# Altium PCB HouseLIght_v0.PcbDoc
Units mm, origin at the board's own origin, x right, y up, seen from the top; angles counter-clockwise.
Board outline 150.23 x 33.22 mm, 2 copper layers (Top Layer, Bottom Layer); 56 components, 50 nets, 133 pads, 101 vias.
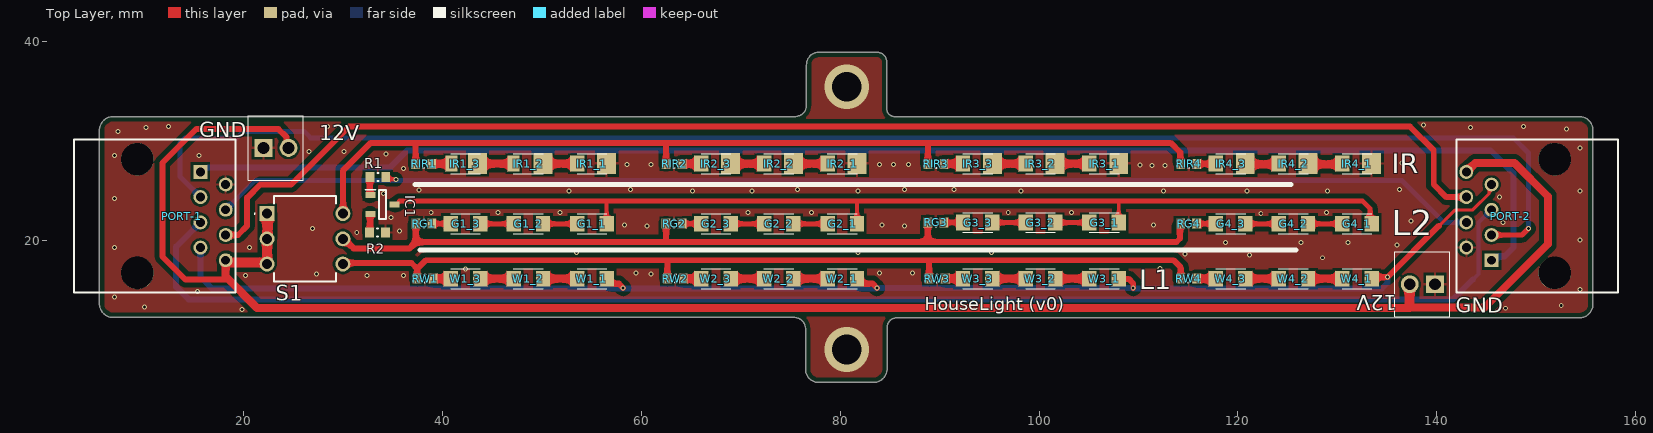
[diagram p0: Top Layer view]
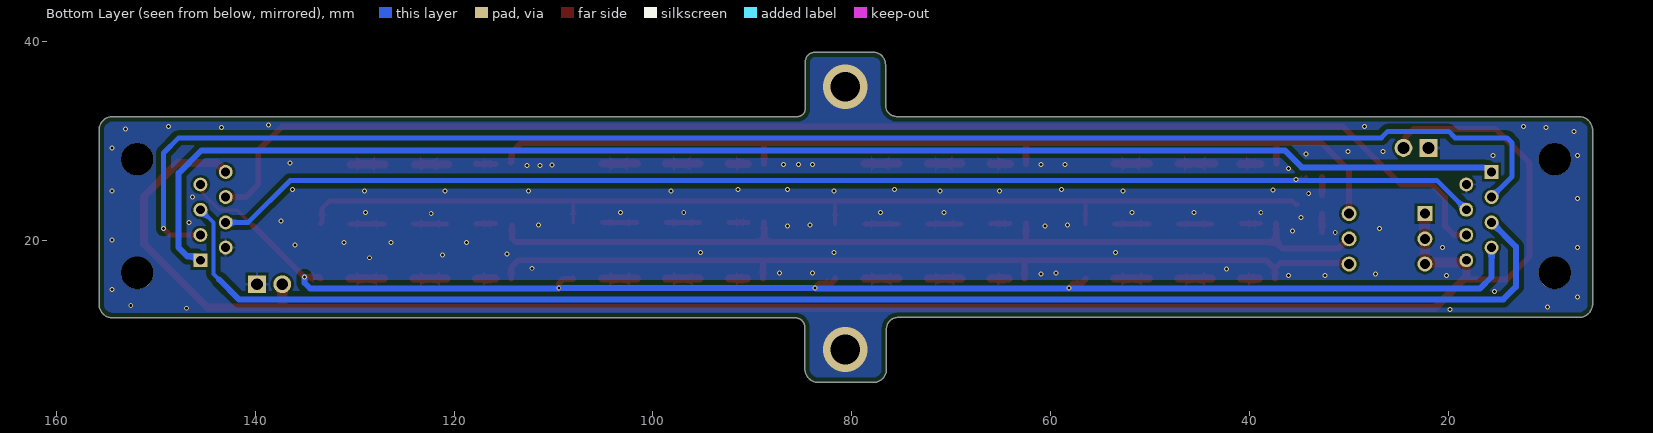
[diagram p1: Bottom Layer view, seen from below]
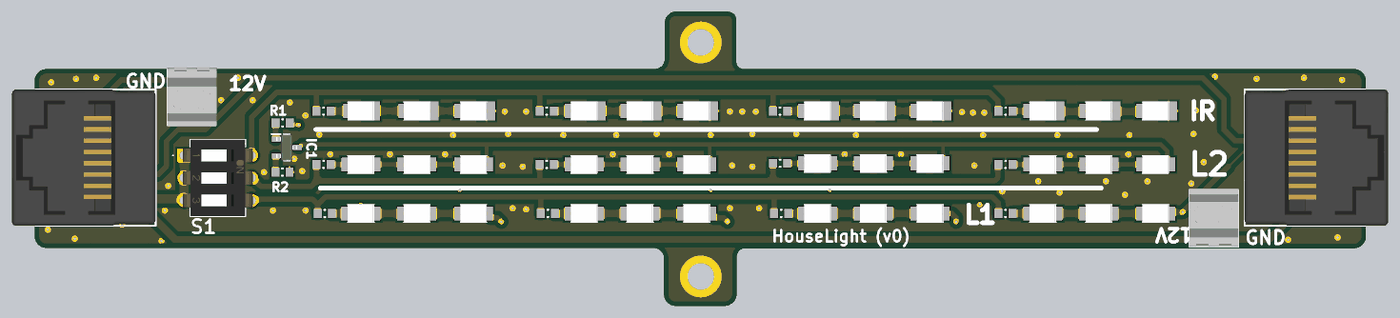
[diagram p2: 3D render of the assembled board from above, using the file's embedded part models]

## Layer stack, top to bottom
Top Solder: solder mask 0.0102, Solder Resist, Dk 3.5
Top Layer: signal copper 0.0356
Dielectric 1: dielectric 0.32, FR-4, Dk 4.8
Bottom Layer: signal copper 0.0356
Bottom Solder: solder mask 0.0102, Solder Resist, Dk 3.5

## Board outline
76.512,7.075 76.512,11.112 ccw(c75.343,11.112) 75.343,12.282 6.858,12.282 cw(c6.858,13.652) 5.488,13.652 5.488,31.115 cw(c6.858,31.115) 6.858,32.485 75.438,32.485 ccw(c75.438,33.655) 76.608,33.655 76.608,37.719 cw(c77.851,37.719) 77.851,38.962 83.693,38.962 cw(c83.693,37.973) 84.682,37.973 84.682,33.274 ccw(c85.471,33.274) 85.471,32.485 154.348,32.485 cw(c154.348,31.115) 155.718,31.115 155.718,13.619 cw(c154.348,13.619) 154.348,12.248 85.7,12.248 ccw(c85.7,11.262) 84.713,11.262 84.713,7.112 cw(c83.343,7.112) 83.343,5.742 77.846,5.742 cw(c77.846,7.075)

## Design rules (kind name [scope] priority, off if disabled: settings)
BoardOutlineClearance [All] p1: gap=0.254 ignorepadtopadclearanceinfootprint=FALSE except(0: Arc-SplitContinuation Track-SplitContinuation SMDPad-SplitContinuation THPad-SplitContinuation Via-SplitContinuation Fill-SplitContinuation Poly-SplitContinuation Region-SplitContinuation Text-SplitContinuation; 0.3: Poly-CavityEdge Poly-CutoutEdge Poly-SplitBarrior; 0.5: Poly-OutlineEdge)
Clearance [All] p1: gap=0.254 ignorepadtopadclearanceinfootprint=FALSE except(0: Arc-Hole Track-Hole SMDPad-Hole THPad-Hole Via-Hole Fill-Hole Poly-Hole Region-Hole; 0.15: SMDPad-SMDPad; 0.203: Arc-Arc Arc-Track Track-Track; 0.25: Arc-SMDPad Track-SMDPad; 0.33: Arc-THPad Track-THPad; 0.5: Arc-Fill Arc-Poly Arc-Region Track-Fill Track-Poly Track-Region THPad-THPad Text-Hole)
DiffPairsRouting [InDifferentialPairClass('All Differential Pairs')] p1: maxlimit=0.203 minlimit=0.203 mostfreqgap=0.203 toplayer_minwidth=0.303 toplayer_maxwidth=0.303 toplayer_prefwidth=0.303 bottomlayer_minwidth=0.303 bottomlayer_maxwidth=0.303 bottomlayer_prefwidth=0.303 impedanceprofiledriven=TRUE maxuncoupledlength=12.7
PolygonConnect [All] p1: thpad.connectstyle=Relief thpad.reliefconductorwidth=0.254 thpad.reliefentries=4 thpad.polygonreliefangle="90 Angle" thpad.airgapwidth=0.254 smdpad.connectstyle=Relief smdpad.reliefconductorwidth=0.254 smdpad.reliefentries=4 smdpad.polygonreliefangle="90 Angle" smdpad.airgapwidth=0.254 via.connectstyle=Direct via.reliefconductorwidth=0.254 via.reliefentries=4 via.polygonreliefangle="90 Angle" via.airgapwidth=0.254
RoutingVias [All] p1: holewidth=0.711 width=1.27 viastyle="Through Hole" minholewidth=0.711 minwidth=1.27 maxholewidth=0.711 maxwidth=1.27
SolderMaskExpansion [All] p1: expansion=0.102 istentingtop=FALSE
SupplyNets "Schematic Supply Nets_2" [InNet('GND')] p1: voltage=0.000
SupplyNets "Schematic Supply Nets_1" [InNet('+5V')] p2: voltage=0.000
SupplyNets "Schematic Supply Nets" [InNet('+12V')] p3: voltage=0.000
UnRoutedNet [All] p1: checkbadconnections=TRUE
Width [All] p1: maxlimit=3 minlimit=0.15 preferedwidth=0.254 minimp=50.000000 maximp=50.000000 favimp=50.000000
28 further rules are at their usual default settings.

## Components (designator, comment, footprint, x,y, rotation, side; value= is the part's Value field where it differs from the comment)
12V "282834-2" 282834-2_1 21.971,29.337 r0 top (schematic designator IO3)
12V "282834-2" 282834-2_1 139.827,15.621 r180 top (schematic designator IO3)
G1_1 "SML-010PTT86" SML010PTT86#1 55.029,21.702 r270 top
G1_2 "SML-010PTT86" SML010PTT86#1 48.629,21.702 r270 top
G1_3 "SML-010PTT86" SML010PTT86#1 42.315,21.702 r270 top
G2_1 "SML-010PTT86" SML010PTT86#1 80.214,21.702 r270 top
G2_2 "SML-010PTT86" SML010PTT86#1 73.814,21.702 r270 top
G2_3 "SML-010PTT86" SML010PTT86#1 67.5,21.702 r270 top
G3_1 "SML-010PTT86" SML010PTT86#1 106.542,21.829 r270 top
G3_2 "SML-010PTT86" SML010PTT86#1 100.142,21.829 r270 top
G3_3 "SML-010PTT86" SML010PTT86#1 93.828,21.829 r270 top
G4_1 "SML-010PTT86" SML010PTT86#1 131.981,21.702 r270 top
G4_2 "SML-010PTT86" SML010PTT86#1 125.581,21.702 r270 top
G4_3 "SML-010PTT86" SML010PTT86#1 119.267,21.702 r270 top
IC1 "SI2302CDS-T1-GE3" SOT96P237X111-3N 33.949,23.622 r0 top
IR1_1 "IN-S126ETHIR" SML010PTT86#2 55.029,27.751 r270 top
IR1_2 "IN-S126ETHIR" SML010PTT86#3 48.629,27.751 r270 top
IR1_3 "IN-S126ETHIR" SML010PTT86#4 42.315,27.751 r270 top
IR2_1 "IN-S126ETHIR" SML010PTT86#2 80.214,27.751 r270 top
IR2_2 "IN-S126ETHIR" SML010PTT86#2 73.814,27.751 r270 top
IR2_3 "IN-S126ETHIR" SML010PTT86#2 67.5,27.751 r270 top
IR3_1 "IN-S126ETHIR" SML010PTT86#2 106.542,27.751 r270 top
IR3_2 "IN-S126ETHIR" SML010PTT86#2 100.142,27.751 r270 top
IR3_3 "IN-S126ETHIR" SML010PTT86#2 93.828,27.751 r270 top
IR4_1 "IN-S126ETHIR" SML010PTT86#2 131.981,27.751 r270 top
IR4_2 "IN-S126ETHIR" SML010PTT86#2 125.581,27.751 r270 top
IR4_3 "IN-S126ETHIR" SML010PTT86#2 119.267,27.751 r270 top
PORT-1 "215877-1" 615008138021 11.049,22.479 r270 top
PORT-2 "215877-1" 615008138021 150.114,22.479 r90 top
R1 "10" 0603R 33.487,26.396 r0 top value=12K1
R2 "100K" 0603R 33.46,20.848 r0 top value=12K1
RG1 "2K2" 0603R 38.111,21.713 r180 top value=12K1
RG2 "2K2" 0603R 63.285,21.713 r180 top value=12K1
RG3 "2K2" 0603R 89.613,21.84 r180 top value=12K1
RG4 "2K2" 0603R 115.052,21.713 r180 top value=12K1
RIR1 "1K3" 0603R 38.1,27.725 r180 top value=12K1
RIR2 "1K3" 0603R 63.285,27.725 r180 top value=12K1
RIR3 "1K3" 0603R 89.613,27.725 r180 top value=12K1
RIR4 "1K3" 0603R 115.052,27.725 r180 top value=12K1
RW1 "2K2" 0603R 38.238,16.183 r180 top value=12K1
RW2 "2K2" 0603R 63.412,16.183 r180 top value=12K1
RW3 "2K2" 0603R 89.74,16.183 r180 top value=12K1
RW4 "2K2" 0603R 115.052,16.183 r180 top value=12K1
S1 "2454982-2" 24549822 22.352,22.733 r270 top
W1_1 "LTW-150TK" SML010PTT86#1 55.029,16.178 r270 top
W1_2 "LTW-150TK" SML010PTT86#1 48.629,16.178 r270 top
W1_3 "LTW-150TK" SML010PTT86#1 42.315,16.178 r270 top
W2_1 "LTW-150TK" SML010PTT86#1 80.214,16.178 r270 top
W2_2 "LTW-150TK" SML010PTT86#1 73.814,16.178 r270 top
W2_3 "LTW-150TK" SML010PTT86#1 67.5,16.178 r270 top
W3_1 "LTW-150TK" SML010PTT86#1 106.542,16.178 r270 top
W3_2 "LTW-150TK" SML010PTT86#1 100.142,16.178 r270 top
W3_3 "LTW-150TK" SML010PTT86#1 93.828,16.178 r270 top
W4_1 "LTW-150TK" SML010PTT86#1 131.981,16.178 r270 top
W4_2 "LTW-150TK" SML010PTT86#1 125.581,16.178 r270 top
W4_3 "LTW-150TK" SML010PTT86#1 119.267,16.178 r270 top

## Footprints (in the part's own frame and the unit in brackets; to place one, negate y for a bottom-side part, rotate by r counter-clockwise, add the part's x,y. Pads: shape width x height; smd on the part's side, far side on the other; paste and mask are expansions set on the pad)
0603R [mm] "Chip Resistor, Body 1.6x0.8mm, IPC Medium Density"
  rect 0.9x1 smd: 1(-0.8,0) 2(0.8,0)
  silkscreen extent -0.05,-0.4 0.05,0.4, body extent -0.85,-0.47 0.85,0.47, height 0.6
282834-2_1 [mm]
  rect 1.8x1.8 hole 1.2: 1(0,0)
  round 1.8 hole 1.2: 2(2.54,0)
  silkscreen extent -1.5,-3.25 4.04,3.25, body extent -1.5,-3.25 4.04,3.25, height 9.87
24549822 [mm]
  rect 1.5x1.5 hole 1: 1(0,0)
  round 1.5 hole 1: 2(2.54,0) 3(5.08,0) 4(5.08,7.62) 5(2.54,7.62) 6(0,7.62)
  silkscreen extent -1.77,-1.3 6.85,6.91, body extent -1.77,-0.13 6.85,7.75, height 7.25
615008138021 [mm] "Modular Jack Vertical Plastic 8P8C"
  rect 1.4x1.4 hole 0.9: 1(-4.445,4.6)
  round 1.4 hole 0.9: 2(-3.175,7.14) 3(-1.905,4.6) 4(-0.635,7.14) 5(0.635,4.6) 6(1.905,7.14) 7(3.175,4.6) 8(4.445,7.14)
  round 3.25 hole 3.25 unplated: MH1(-5.715,-1.75) MH2(5.715,-1.75)
  silkscreen extent -7.7,-8.1 7.7,8.1, body extent -7.7,-8.1 7.7,8.1, height 16.5
SML010PTT86#1 [mm]
  rect 1.6x1.45 smd: 1(0,1.475) 2(0,-1.475)
  silkscreen extent -1,-1.5 1,1.5, body extent -1,-1.52 1,1.52, height 1.5
SML010PTT86#2 [mm]
  rect 2.1x1.9 smd: 1(0,1.475)
  rect 1.6x1.45 smd: 2(0,-1.475)
  silkscreen extent -1,-1.5 1,1.5, body extent -1,-1.52 1,1.52, height 1.5
SML010PTT86#3 [mm]
  rect 2.1x1.9 smd: 1(0,1.475)
  rect 1.6x1.2 smd: 2(0,-1.475)
  silkscreen extent -1,-1.5 1,1.5, body extent -1,-1.52 1,1.52, height 1.5
SML010PTT86#4 [mm]
  rect 2.1x1.9 smd: 1(0,1.203)
  rect 1.6x1.2 smd: 2(0,-1.397)
  silkscreen extent -1,-1.5 1,1.5, body extent -1,-1.52 1,1.52, height 1.5
SOT96P237X111-3N [mm]
  rect 1x0.6 smd: 1(-1.2,0.955) 2(-1.2,-0.955) 3(1.2,0)
  silkscreen extent -1.7,-1.46 0.35,1.5, body extent -1.19,-1.46 1.19,1.46, height 1.11

## Part data
12V 12V: "Connector", Manufacturer_Name="TE Connectivity", Mouser2 Part Number=571-282834-2, Datasheet Link=https://componentsearchengine.com//282834-2.pdf, Manufacturer_Part_Number=282834-2, Mouser2 Price/Stock=https://www.mouser.com/Search/Refine.aspx?Keyword=571-282834-2
G1_1 G1_2 G1_3 G2_1 G2_2 G2_3 G3_1 G3_2 G3_3 G4_1 G4_2 G4_3: "2.2V 20mA 555nm 6.3mcd Emerald Green Water Clear SMD,3x2mm LED Indication - Discrete ROHS", Manufacturer_Name="ROHM Semiconductor", Mouser Part Number=755-SML-010PTT86, Datasheet Link=https://componentsearchengine.com/Datasheets/1/SML-010PTT86.pdf, Manufacturer_Part_Number=SML-010PTT86, Mouser Price/Stock=https://www.mouser.co.uk/ProductDetail/ROHM-Semiconductor/SML-010PTT86?qs=4kLU8WoGk0sTbaHXE%252BLu9Q%3D%3D
IC1: "1 N-Channel 2.9A 20V 3.5nC@10V,4.5V 550mW 75mΩ@2.5V,3.1A 850mV@250uA N-Channel SOT-23 MOSFETs ROHS (C10488)", Manufacturer_Name=Vishay, Mouser Part Number=781-SI2302CDS-T1-GE3, Arrow Part Number=SI2302CDS-T1-GE3, Arrow Price/Stock=https://www.arrow.com/en/products/si2302cds-t1-ge3/vishay?utm_currency=USD&region=europe, Datasheet Link=https://datasheet.datasheetarchive.com/originals/distributors/Datasheets-DGA23/1579559.pdf, Height=1.12mm, Manufacturer_Part_Number=SI2302CDS-T1-GE3, Mouser Price/Stock=https://www.mouser.co.uk/ProductDetail/Vishay-Semiconductors/SI2302CDS-T1-GE3?qs=IRuQNBqMOcmu69KRt6rZUQ%3D%3D
IR1_1 IR1_2 IR1_3 IR2_1 IR2_2 IR2_3 IR3_1 IR3_2 IR3_3 IR4_1 IR4_2 IR4_3: library part SML-010PTT86, "-40℃~+85℃ 1.2V 30° 5mW/sr@20mA 940nm 1206 Infrared LED Emitters ROHS (C22466173)", Manufacturer_Name="ROHM Semiconductor", Mouser Part Number=755-SML-010PTT86, Datasheet Link=https://componentsearchengine.com/Datasheets/1/SML-010PTT86.pdf, Manufacturer_Part_Number=SML-010PTT86, Mouser Price/Stock=https://www.mouser.co.uk/ProductDetail/ROHM-Semiconductor/SML-010PTT86?qs=4kLU8WoGk0sTbaHXE%252BLu9Q%3D%3D
PORT-1 PORT-2: library part CMP-1502-01725-1, "-40℃~+70℃ 1 Gold Non-LED Phosphor Bronze RJ45 Jack Unshielded cat3 Plugin Ethernet Connectors / Modular Connectors (RJ45 RJ11) ROHS (C305919)", Contact Resistance=20mOhm, Manufacturer="Wurth Elektronik", Operating Temperature=-40to85degC, Package Reference=615008138021, Rated Current=1.5A, Withstanding Voltage=1000VAC, Working Voltage=120VAC, Compliance=Leadfree/RoHS, Datasheet URL=https://katalog.we-online.de/em/datasheet/615008138021.pdf, Entrance=Vertical, Manufacturer URL=http://www.we-online.de, Mounting Technology=THT, Packaging=Tray, Part Number=615008138021, Pin Number=8P8C, Port=1x1, Publisher=WurthElektronik
R1: library part Res_12K1_1%_0603, "-55℃~+155℃ 100kΩ 100mW 75V Thick Film Resistor ±1% ±100ppm/℃ 0603 Chip Resistor - Surface Mount ROHS (C14675)", Manuf_1=VISHAY, Manuf_Part_1="MCT 0603-50 1% P5 12K1", Distrib=FARNELL, ECCN_US/EU=n/a, Order=2325243
R2: library part Res_12K1_1%_0603, "-55℃~+155℃ 100mW 100kΩ 75V Thick Film Resistor ±1% ±100ppm/℃ 0603 Chip Resistor - Surface Mount ROHS", Manuf_1=VISHAY, Manuf_Part_1="MCT 0603-50 1% P5 12K1", Distrib=FARNELL, ECCN_US/EU=n/a, Order=2325243
RG1 RG2 RG3 RG4 RIR1 RIR2 RIR3 RIR4 RW1 RW2 RW3 RW4: library part Res_12K1_1%_0603, "-55℃~+155℃ 100mW 2.2kΩ 75V Thick Film Resistor ±1% ±100ppm/℃ 0603 Chip Resistor - Surface Mount ROHS (C309562)", Manuf_1=VISHAY, Manuf_Part_1="MCT 0603-50 1% P5 12K1", Distrib=FARNELL, ECCN_US/EU=n/a, Order=2325243
S1: "Switch", Manufacturer_Name="TE Connectivity", Mouser Part Number=655-2454982-2, Arrow Part Number=2454982-2, Arrow Price/Stock=https://www.arrow.com/en/products/2454982-2/te-connectivity?region=nac, Datasheet Link=https://www.mouser.com/datasheet/2/418/3/NG_CS_1308111-1_SWITCHES_CORE_PROGRAM_CATALOG_0308-1234892.pdf, Height=4.51mm, Manufacturer_Part_Number=2454982-2, Mouser Price/Stock=https://www.mouser.co.uk/ProductDetail/TE-Connectivity-Alcoswitch/2454982-2?qs=1Kr7Jg1SGW%2FyvNyTL9wDrw%3D%3D
W1_1 W1_2 W1_3 W2_1 W2_2 W2_3 W3_1 W3_2 W3_3 W4_1 W4_2 W4_3: library part SML-010PTT86, "-20℃~+80℃ 130° 20mA 260mcd 3.2V 70mW Discrete Diode White Yellow Lens 1206 LED Indication - Discrete ROHS (C133134)", Manufacturer_Name="ROHM Semiconductor", Mouser Part Number=755-SML-010PTT86, Datasheet Link=https://componentsearchengine.com/Datasheets/1/SML-010PTT86.pdf, Manufacturer_Part_Number=SML-010PTT86, Mouser Price/Stock=https://www.mouser.co.uk/ProductDetail/ROHM-Semiconductor/SML-010PTT86?qs=4kLU8WoGk0sTbaHXE%252BLu9Q%3D%3D

## Via types
v1: diameter 0.5, hole 0.3, Top Layer to Bottom Layer, 99 vias
v2: diameter 4.5, hole 3, Top Layer to Bottom Layer, 2 vias

## Nets (pads, with @x,y where several pads share a name; then routed paths per layer and width w, separated by ;. In a path a pad name is that pad's centre, name@x,y a point inside that pad or via, vN(x,y) a via of type N, cw(c..) or ccw(c..) an arc to the next point about the centre after c; other vN are vias at no path point)
+5V: PORT-1.6 PORT-2.6 | length 135.9
  Top Layer w0.6: PORT-1.6 19.421,20.574 20.35,21.502 20.35,24.324 21.679,25.654 24.765,25.654 30.586,31.475 137.308,31.475 139.7,29.083 139.7,25.654 140.97,24.384 PORT-2.6
+12V: 12V.2 PORT-1.8 PORT-2.8 S1.1 S1.2 S1.3 | length 197.2
  Top Layer w0.6: 18.288,16.101 14.125,16.101 11.811,18.415 11.811,27.813 15.24,31.242 23.487,31.242 24.281,30.447 24.281,29.567 12V.2@24.511,29.337
  Top Layer w0.8: PORT-1.8 18.189,16.402 21.348,13.243 137.173,13.243 ; 137.197,13.263 144.787,13.263 151.172,19.648 151.172,24.469 147.813,27.828 143.878,27.828 PORT-2.8
  Top Layer w1: PORT-1.8 18.297,18.034 18.506,17.825 S1.3@22.352,17.825 ; S1.3 S1.3@22.352,17.825 ; S1.1 22.393,22.692 22.393,20.234 S1.2 S1.3@22.352,17.825 ; 137.265,13.322 12V.2@137.265,15.599
DIO_A: PORT-1.1 PORT-2.1 | length 144.1
  Bottom Layer w0.6: PORT-1.1 16.049,27.324 16.338,27.324 16.4,27.387 34.753,27.387 36.449,29.083 145.415,29.083 147.701,26.797 147.701,19.304 146.831,18.434 145.914,18.434 PORT-2.1
GND: 12V.1 IR1_1.1 IR2_1.1 IR3_1.1 IR4_1.1 PORT-1.2 PORT-2.2 R2.2
  other v1: 19.812,13.081 146.939,13.208 10.033,13.335 152.527,13.462 6.985,14.351 15.367,14.915 154.432,15.113 20.193,16.51 32.385,16.51 36.068,16.51 27.305,16.637 60.96,16.637 59.436,16.764 83.947,16.764 87.249,16.764 42.291,17.145 112.145,17.23 128.524,18.288 121.158,18.542 114.681,18.669 53.467,18.838 81.788,18.838 95.221,18.838 6.985,19.304 20.574,19.304 136.017,19.558 118.745,19.812 126.365,19.812 131.064,19.812 154.432,20.066 31.369,20.828 35.687,20.955 26.924,21.209 60.579,21.463 86.487,21.463 58.293,21.59 84.201,21.59 111.531,21.594 146.685,21.844 137.414,21.971 34.798,22.352 122.301,22.733 38.862,22.86 45.593,22.86 51.816,22.86 70.739,22.86 77.089,22.86 96.901,22.86 103.251,22.86 128.905,22.86 6.985,24.257 146.304,24.384 34.036,24.765 52.705,25.019 65.151,25.019 71.12,25.019 81.788,25.019 98.171,25.019 112.522,25.019 120.904,25.019 129.032,25.019 154.432,25.019 37.614,25.081 58.928,25.146 75.692,25.146 86.487,25.146 91.44,25.146 136.271,25.146 36.052,27.244 111.379,27.559 112.649,27.559 110.135,27.629 58.547,27.686 60.96,27.686 83.947,27.686 85.344,27.686 86.868,27.686 86.868,27.686 136.525,27.813 6.985,28.575 15.494,28.575 34.29,28.702 26.543,28.956 30.099,28.956 154.432,29.337 7.366,30.988 153.035,31.242 10.16,31.369 143.383,31.369 12.446,31.496 28.448,31.496 148.717,31.496 138.684,31.623
  other v2: 80.664,9.064 80.664,35.48
GRN_LED: PORT-1.4 PORT-2.4 R1.2 | length 128.9
  Top Layer w0.4: R1.2 34.502,26.181 35.287,26.181 v1(35.306,26.162)
  Bottom Layer w0.5: PORT-1.4 21.123,26.048 136.512,26.048 140.716,21.844 PORT-2.4
GRN_PWR: RG1.2 RG2.2 RG3.2 RG4.2 S1.5 | length 91.9
  Top Layer w0.6: S1.5@30.089,20.193 31.057,19.225 36.683,19.225 37.311,19.853 ; RG1.2 37.311,19.853 ; 62.485,19.873 88.813,19.873 ; RG2.2 62.485,19.853 37.311,19.853 ; RG3.2 88.813,19.873 ; RG4.2@114.173,21.512 114.173,20.225 113.822,19.873 88.813,19.873
IR_PWR: RIR1.2 RIR2.2 RIR3.2 RIR4.2 S1.6 | length 97.7
  Top Layer w0.6: S1.6@30.001,22.574 30.001,27.08 32.766,29.845 37.211,29.845 ; RIR1.2 37.3,29.756 37.211,29.845 ; RIR2.2 62.485,29.59 62.23,29.845 ; RIR3.2 88.813,29.718 ; RIR4.2@114.319,27.875 114.257,27.875 114.207,27.925 114.207,28.87 113.232,29.845 88.813,29.845 62.485,29.845 62.23,29.845 ; 37.211,29.845 62.23,29.845
NetG1_1_1: G1_1.1 G2_1.1 G3_1.1 G4_1.1 IC1.3 | length 107
  Top Layer w0.4: G1_1.1 56.504,23.976 ; 81.534,23.976 81.689,23.821 G2_1.1 ; G3_1.1 108.017,23.916 108.077,23.976
  Top Layer w0.5: IC1.3 35.349,23.622 35.399,23.672 35.399,23.684 35.692,23.976 56.504,23.976 81.534,23.976 108.077,23.976 132.546,23.976 133.3,23.223 133.3,21.859 G4_1.1
NetG1_1_2: G1_1.2 G1_2.1 | length 3.5
  Top Layer w0.5: G1_2.1 G1_1.2
NetG1_2_2: G1_2.2 G1_3.1 | length 3.4
  Top Layer w0.5: G1_3.1 G1_2.2
NetG1_3_2: G1_3.2 RG1.1 | length 1.9
  Top Layer w0.5: RG1.1 G1_3.2@40.815,21.713
NetG2_1_2: G2_1.2 G2_2.1 | length 3.5
  Top Layer w0.5: G2_2.1 G2_1.2
NetG2_2_2: G2_2.2 G2_3.1 | length 3.4
  Top Layer w0.5: G2_3.1 G2_2.2
NetG2_3_2: G2_3.2 RG2.1 | length 1.9
  Top Layer w0.5: RG2.1 66.015,21.713 G2_3.2
NetG3_1_2: G3_1.2 G3_2.1 | length 3.5
  Top Layer w0.5: G3_2.1 G3_1.2
NetG3_2_2: G3_2.2 G3_3.1 | length 3.4
  Top Layer w0.5: G3_3.1 G3_2.2
NetG3_3_2: G3_3.2 RG3.1 | length 1.9
  Top Layer w0.5: RG3.1 92.343,21.84 G3_3.2
NetG4_1_2: G4_1.2 G4_2.1 | length 3.5
  Top Layer w0.5: G4_2.1 G4_1.2
NetG4_2_2: G4_2.2 G4_3.1 | length 3.4
  Top Layer w0.5: G4_3.1 G4_2.2
NetG4_3_2: G4_3.2 RG4.1 | length 1.9
  Top Layer w0.5: RG4.1 117.782,21.713 G4_3.2
NetIC1_1: IC1.1 R1.1 | length 1.8
  Top Layer w0.6: IC1.1@32.687,24.577 R1.1
NetIC1_2: IC1.2 R2.1 | length 1.8
  Top Layer w0.6: R2.1@32.704,20.893 IC1.2@32.704,22.667
NetIR1_1_2: IR1_1.2 IR1_2.1 | length 3.5
  Top Layer w0.8: IR1_2.1 IR1_1.2
NetIR1_2_2: IR1_2.2 IR1_3.1 | length 3.6
  Top Layer w0.8: IR1_3.1 IR1_2.2
NetIR1_3_2: IR1_3.2 RIR1.1 | length 2
  Top Layer w0.8: RIR1.1 38.913,27.738 40.905,27.738 IR1_3.2
NetIR2_1_2: IR2_1.2 IR2_2.1 | length 3.5
  Top Layer w0.8: IR2_2.1 IR2_1.2
NetIR2_2_2: IR2_2.2 IR2_3.1 | length 3.4
  Top Layer w0.8: IR2_3.1 IR2_2.2
NetIR2_3_2: IR2_3.2 RIR2.1 | length 2
  Top Layer w0.8: RIR2.1 64.098,27.738 66.012,27.738 IR2_3.2
NetIR3_1_2: IR3_1.2 IR3_2.1 | length 3.5
  Top Layer w0.8: IR3_2.1 IR3_1.2
NetIR3_2_2: IR3_2.2 IR3_3.1 | length 3.4
  Top Layer w0.8: IR3_3.1 IR3_2.2
NetIR3_3_2: IR3_3.2 RIR3.1 | length 2
  Top Layer w0.8: RIR3.1 90.426,27.738 92.34,27.738 IR3_3.2
NetIR4_1_2: IR4_1.2 IR4_2.1 | length 3.5
  Top Layer w0.8: IR4_2.1@126.979,27.686 IR4_1.2@130.429,27.686
NetIR4_2_2: IR4_2.2 IR4_3.1 | length 3.4
  Top Layer w0.8: IR4_3.1@120.588,27.686 IR4_2.2@123.952,27.686
NetIR4_3_2: IR4_3.2 RIR4.1 | length 2
  Top Layer w0.6: RIR4.1 115.865,27.738 117.779,27.738 IR4_3.2
NetRW1_1: RW1.1 W1_3.2 | length 1.8
  Top Layer w0.8: RW1.1 39.041,16.181 40.838,16.181 W1_3.2
NetRW2_1: RW2.1 W2_3.2 | length 1.8
  Top Layer w0.8: RW2.1 64.215,16.181 66.023,16.181 W2_3.2
NetRW3_1: RW3.1 W3_3.2 | length 1.8
  Top Layer w0.5: W3_3.2@92.348,16.183 W3_3.2
  Top Layer w0.8: RW3.1 W3_3.2@92.348,16.183
NetRW4_1: RW4.1 W4_3.2 | length 1.9
  Top Layer w0.8: RW4.1 115.855,16.181 117.79,16.181 W4_3.2
NetW1_1_2: W1_1.2 W1_2.1 | length 3.4
  Top Layer w0.8: W1_2.1 W1_1.2
NetW1_2_2: W1_2.2 W1_3.1 | length 3.4
  Top Layer w0.8: W1_3.1 W1_2.2
NetW2_1_2: W2_1.2 W2_2.1 | length 3.5
  Top Layer w0.8: W2_2.1 W2_1.2
NetW2_2_2: W2_2.2 W2_3.1 | length 3.4
  Top Layer w0.8: W2_3.1 W2_2.2
NetW3_1_2: W3_1.2 W3_2.1 | length 3.5
  Top Layer w0.8: W3_2.1 W3_1.2
NetW3_2_2: W3_2.2 W3_3.1 | length 3.4
  Top Layer w0.8: W3_3.1 W3_2.2
NetW4_1_2: W4_1.2 W4_2.1 | length 3.5
  Top Layer w0.8: W4_2.1 W4_1.2
NetW4_2_2: W4_2.2 W4_3.1 | length 3.4
  Top Layer w0.8: W4_3.1 W4_2.2
POW_2A: PORT-1.3 PORT-2.3 | length 154.9
  Top Layer w0.5: PORT-2.3 148.57,20.574 v1(149.225,21.229)
  Bottom Layer w0.5: PORT-1.3 13.589,26.444 13.589,29.845 14.097,30.353 19.323,30.353 19.969,30.999 26.083,30.999 26.729,30.353 147.701,30.353 149.225,28.829 v1(149.225,21.229)
POW_2C: PORT-1.5 PORT-2.5 | length 147.1
  Bottom Layer w0.4: 143.666,16.099 144.225,16.658 144.225,21.824 PORT-2.5
  Bottom Layer w0.6: PORT-1.5 13.208,19.403 13.208,15.367 14.464,14.111 136.634,14.111 136.653,14.091 140.988,14.091 141.008,14.111 141.648,14.111 143.637,16.099
WHT_LED: PORT-1.7 PORT-2.7 W1_1.1 W2_1.1 W3_1.1 W4_1.1 | length 146.7
  Top Layer w0.3: 140.208,21.494 140.248,21.494 141.868,23.114 143.635,23.114 145.304,24.783 145.304,25.443 PORT-2.7
  Top Layer w0.6: W1_1.1 56.504,16.103 56.929,15.678 57.728,15.678 v1(58.166,15.24) ; W2_1.1 81.689,16.103 82.114,15.678 83.255,15.678 v1(83.693,15.24) ; W3_1.1 108.037,16.159 109.016,16.159 109.474,15.701 v1(109.474,15.24) ; W4_1.1 133.609,16.331 v1(135.046,16.331) 140.208,21.494
  Bottom Layer w0.6: PORT-1.7 15.649,16.355 16.797,15.207 83.66,15.207 v1(83.693,15.24) 109.441,15.24 109.474,15.207 134.49,15.207 135.046,15.762 v1(135.046,16.331)
WT_PWR: RW1.2 RW2.2 RW3.2 RW4.2 S1.4 | length 91.1
  Top Layer w0.6: S1.4 30.084,17.765 36.88,17.765 37.463,17.182 38.315,18.034 62.738,18.034 ; RW1.2 37.438,17.182 ; RW2.2 62.612,17.908 62.738,18.034 ; RW3.2 88.94,17.947 89.027,18.034 ; RW4.2 114.252,17.32 113.538,18.034 89.027,18.034 ; 62.738,18.034 89.027,18.034
pads on no net: PORT-1.MH1 PORT-1.MH2 PORT-2.MH1 PORT-2.MH2

## Polygon pours and split planes (outlines as drawn)
GND on Bottom Layer "GND" (solid, pour order 1): 5.207,40.386 156.845,40.386 156.845,4.826 157.226,4.445 155.575,2.794 5.334,2.794
GND on Top Layer "GND" (solid, remove dead copper, pour order 3): 5.207,40.386 5.461,40.64 156.591,40.64 156.591,3.937 156.972,3.556 155.956,2.54 4.445,2.54

## Silkscreen, mask and mechanical layers (free items; w line width, h text height)
Top Overlay:
  lines w0.5: 37.211,25.654 125.349,25.654 ; 37.719,19.05 125.857,19.05
  text "GND" at 15.54,30.399 h1.5
  text "IR" at 135.501,26.789 h2
  text "L2" at 135.501,20.566 h2.5
  text "L1" at 110.101,15.105 h2
  text "HouseLight (v0)" at 88.519,13.006 h1.3
  text "GND" at 141.905,12.746 h1.5
Mechanical 1:
  lines w0.2: 5.588,29.718 5.588,31.115 cw(c6.858,31.115) 6.858,32.385 75.438,32.385 ccw(c75.438,33.655) 76.708,33.655 76.708,37.719 cw(c77.851,37.719) 77.851,38.862 83.693,38.862 cw(c83.693,37.973) 84.582,37.973 84.582,33.274 ccw(c85.471,33.274) 85.471,32.385 154.348,32.385 cw(c154.348,31.115) 155.618,31.115 155.618,13.619 cw(c154.348,13.619) 154.348,12.349 85.7,12.349 ccw(c85.7,11.262) 84.613,11.262 84.613,7.112 cw(c83.343,7.112) 83.343,5.842 77.846,5.842 cw(c77.846,7.075) 76.613,7.075 76.613,11.112 ccw(c75.343,11.112) 75.343,12.382 6.858,12.382 cw(c6.858,13.652) 5.588,13.652 5.588,30.416